# Altium PCB PCB_Micros.PcbDoc
Units mm, origin at the board's own origin, x right, y up, seen from the top; angles counter-clockwise.
Board outline 152.4 x 101.6 mm, 2 copper layers (Top Layer, Bottom Layer); 22 components, 23 nets, 137 pads, 0 vias.
Unrouted connection lines stored in the file: 55.
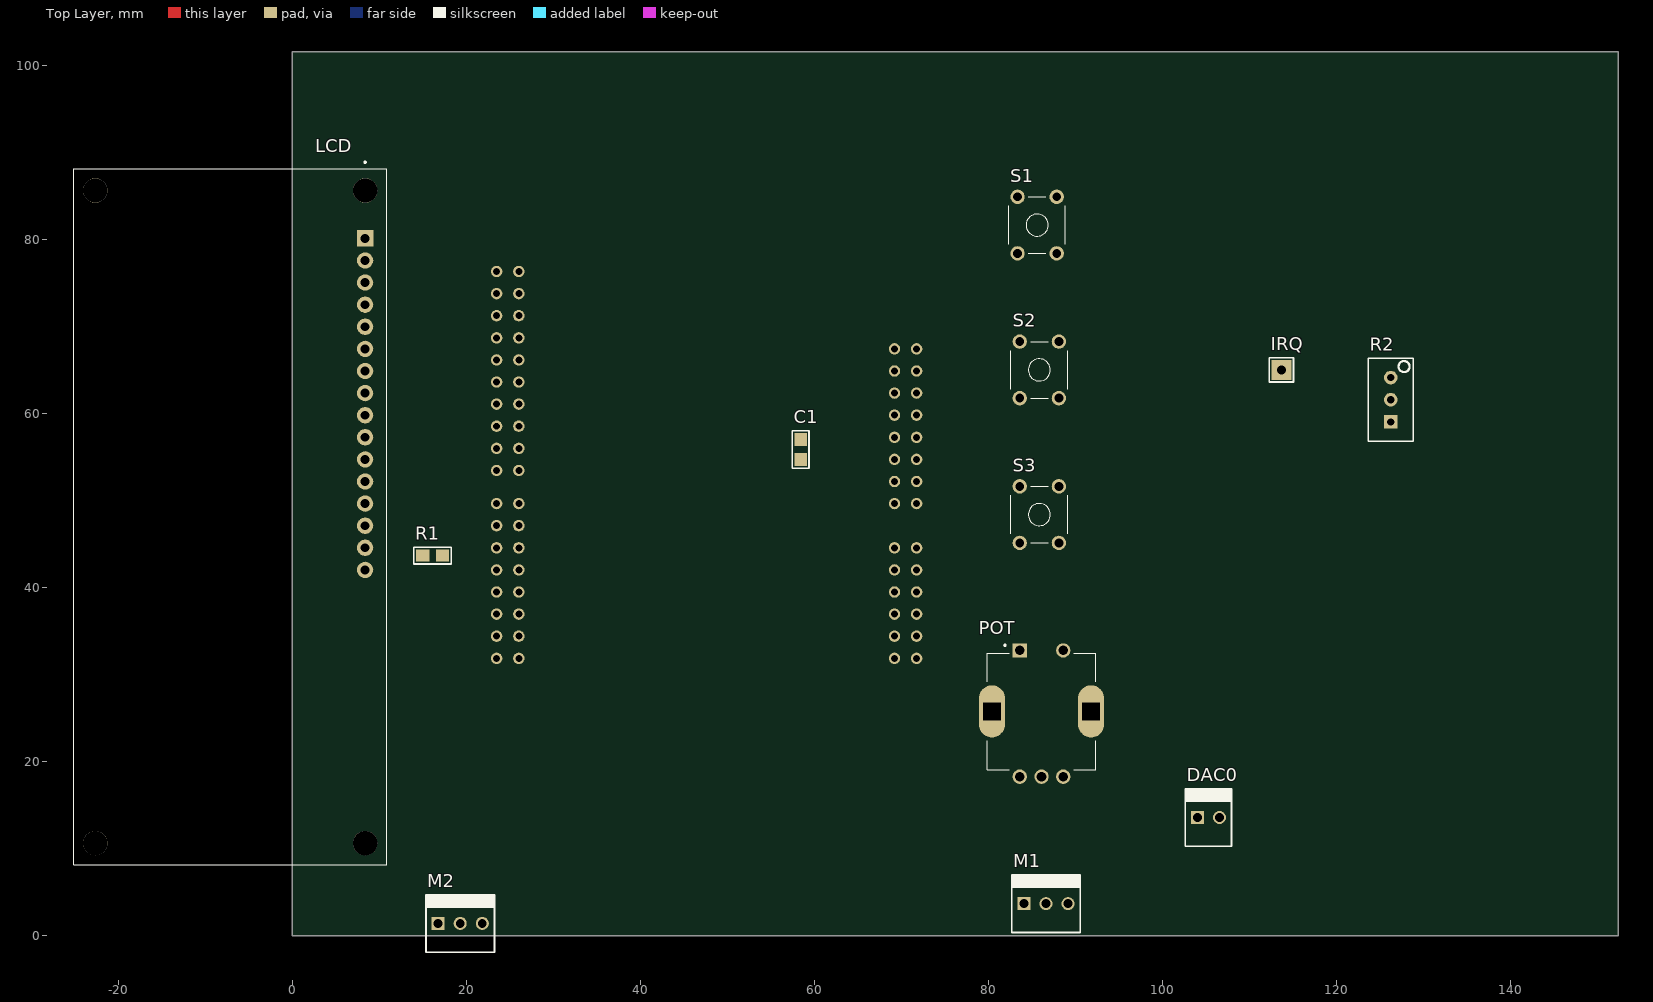
[diagram p0: Top Layer view]
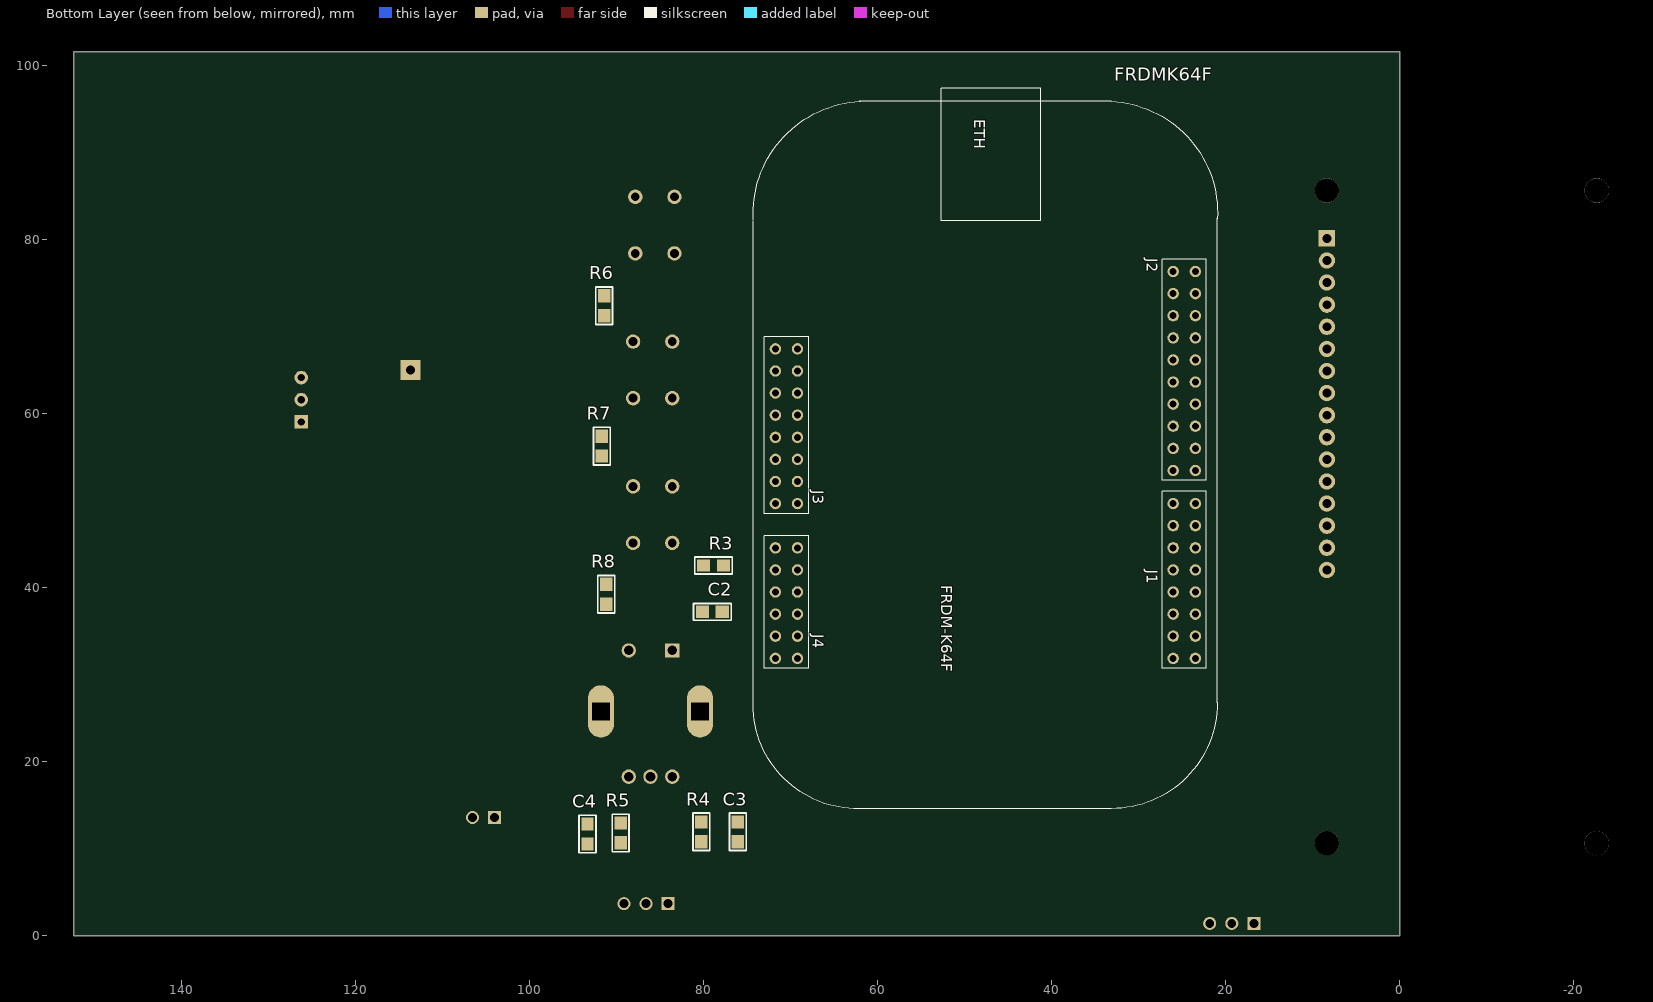
[diagram p1: Bottom Layer view, seen from below]

## Layer stack, top to bottom
Top Solder: solder mask 0.0102, Solder Resist, Dk 3.5
Top Layer: signal copper 0.0356
Dielectric 1: dielectric 0.32, FR-4, Dk 4.8
Bottom Layer: signal copper 0.0356
Bottom Solder: solder mask 0.0102, Solder Resist, Dk 3.5

## Board outline
0,0 152.4,0 152.4,101.6 0,101.6

## Design rules (kind name [scope] priority, off if disabled: settings)
Clearance [All] p1: gap=0.254 ignorepadtopadclearanceinfootprint=FALSE except(0: Arc-Hole Track-Hole SMDPad-Hole THPad-Hole Via-Hole Fill-Hole Poly-Hole Region-Hole Text-Hole)
PolygonConnect [All] p1: connectstyle=Relief reliefconductorwidth=0.254 reliefentries=4 polygonreliefangle="90 Angle" airgapwidth=0.254
RoutingVias [All] p1: holewidth=0.711 width=1.27 viastyle="Through Hole" minholewidth=0.711 minwidth=1.27 maxholewidth=0.711 maxwidth=1.27
SolderMaskExpansion [All] p1: expansion=0.102 istentingtop=FALSE
Width [All] p1: maxlimit=0.254 minlimit=0.254 preferedwidth=0.254
30 further rules are at their usual default settings.

## Components (designator, comment, footprint, x,y, rotation, side; value= is the part's Value field where it differs from the comment)
C1 "100n" 0805 58.42,55.88 r270 top
C2 "100n" 0805 78.994,37.211 r0 bottom
C3 "100n" 0805 76.073,11.938 r270 bottom
C4 "100n" 0805 93.345,11.684 r270 bottom
DAC0 "MOLEX2" MOLEX2 104.013,13.589 r0 top
FRDMK64F "FRDM-K64F" FRDM-K64F 47.625,55.499 r270 bottom
IRQ "TP" TPTH 113.665,65.024 r0 top
LCD "LCD-16X2" MODULE_LCD-16X2 -7.125,48.137 r270 top
M1 "MOLEX3" MOLEX3 84.074,3.683 r0 top
M2 "MOLEX3" MOLEX3 16.764,1.412 r0 top
POT "PEC11R-4215F-S0024" XDCR_PEC11R-4215F-S0024 86.106,25.781 r0 top (schematic designator MT?)
R1 "330" 0805 16.129,43.688 r180 top
R2 "10k" "PRESET V" 126.238,61.595 r90 top
R3 "10k" 0805 78.867,42.545 r0 bottom
R4 "10k" 0805 80.264,11.938 r270 bottom
R5 "10k" 0805 89.535,11.811 r270 bottom
R6 "10k" 0805 91.44,72.39 r90 bottom
R7 "10k" 0805 91.694,56.261 r270 bottom
R8 "10k" 0805 91.186,39.243 r90 bottom
S1 "PLAY SWITCH" TACTSWITCH 85.598,81.661 r0 top
S2 "NEXT SWITCH" TACTSWITCH 85.852,65.024 r0 top
S3 "PREV SWITCH" TACTSWITCH 85.852,48.387 r0 top

## Footprints (in the part's own frame and the unit in brackets; to place one, negate y for a bottom-side part, rotate by r counter-clockwise, add the part's x,y. Pads: shape width x height; smd on the part's side, far side on the other; paste and mask are expansions set on the pad)
0805 [mil] "Pasivo 0805"
  rect 60x56 smd: 1(-45,0) 2(45,0)
  silkscreen extent -85,-38 85,38, body extent -40,-25 39,25, height 15
FRDM-K64F [mm]
  round 1.308 hole 0.8: J1-1(23.622,21.59) J1-2(23.622,24.13) J1-3(21.082,21.59) J1-4(21.082,24.13) J1-5(18.542,21.59) J1-6(18.542,24.13) J1-7(16.002,21.59) J1-8(16.002,24.13) J1-9(13.462,21.59) J1-10(13.462,24.13) J1-11(10.922,21.59) J1-12(10.922,24.13) J1-13(8.382,21.59) J1-14(8.382,24.13) J1-15(5.842,21.59) J1-16(5.842,24.13) J2-1(2.032,21.59) J2-2(2.032,24.13) J2-3(-0.508,21.59) J2-4(-0.508,24.13) J2-5(-3.048,21.59) J2-6(-3.048,24.13) J2-7(-5.588,21.59) J2-8(-5.588,24.13) J2-9(-8.128,21.59) J2-10(-8.128,24.13) J2-11(-10.668,21.59) J2-12(-10.668,24.13) J2-13(-13.208,21.59) J2-14(-13.208,24.13) J2-15(-15.748,21.59) J2-16(-15.748,24.13) J2-17(-18.288,21.59) J2-18(-18.288,24.13) J2-19(-20.828,21.59) J2-20(-20.828,24.13) J3-1(-11.938,-21.59) J3-2(-11.938,-24.13) J3-3(-9.398,-21.59) J3-4(-9.398,-24.13) J3-5(-6.858,-21.59) J3-6(-6.858,-24.13) J3-7(-4.318,-21.59) J3-8(-4.318,-24.13) J3-9(-1.778,-21.59) J3-10(-1.778,-24.13) J3-11(0.762,-21.59) J3-12(0.762,-24.13) J3-13(3.302,-21.59) J3-14(3.302,-24.13) J3-15(5.842,-21.59) J3-16(5.842,-24.13) J4-1(10.922,-21.59) J4-2(10.922,-24.13) J4-3(13.462,-21.59) J4-4(13.462,-24.13) J4-5(16.002,-21.59) J4-6(16.002,-24.13) J4-7(18.542,-21.59) J4-8(18.542,-24.13) J4-9(21.082,-21.59) J4-10(21.082,-24.13) J4-11(23.622,-21.59) J4-12(23.622,-24.13)
  silkscreen extent -41.91,-26.69 40.89,26.69
MODULE_LCD-16X2 [mm]
  rect 1.88x1.88 / inner round 1.88 / far side rect 1.88x1.88 hole 1.016: 1(-32,15.5)
  round 1.88 hole 1.016: 2(-29.46,15.5) 3(-26.92,15.5) 4(-24.38,15.5) 5(-21.84,15.5) 6(-19.3,15.5) 7(-16.76,15.5) 8(-14.22,15.5) 9(-11.68,15.5) 10(-9.14,15.5) 11(-6.6,15.5) 12(-4.06,15.5) 13(-1.52,15.5) 14(1.02,15.5) 15(3.56,15.5) 16(6.1,15.5)
  round 2.8 hole 2.8 unplated: ""(-37.5,-15.5) ""(-37.5,15.5) ""(37.5,-15.5) ""(37.5,15.5)
  silkscreen extent -40.85,-18 40,18
MOLEX2 [mm]
  rect 1.5x1.5 hole 1.016: 1(0,0)
  round 1.5 hole 1.016: 2(2.54,0)
  silkscreen extent -1.4,-3.3 3.94,3.3, body extent -1.27,-3.17 3.81,3.17, height 10.74
MOLEX3 [mm]
  rect 1.5x1.5 hole 1.016: 1(0,0)
  round 1.5 hole 1.016: 2(2.54,0) 3(5.08,0)
  silkscreen extent -1.4,-3.3 6.48,3.3, body extent -1.27,-3.17 6.35,3.17, height 10.74
"PRESET V" [mil]
  rect 62x62 hole 32: 1(-100,0)
  round 62 hole 32: 2(0,0) 3(100,0)
  silkscreen extent -188,-102 188,102, body extent -185,-95 190,95, height 455
TACTSWITCH [mil]
  round 65 hole 40: 1(-88.58,-127.95) 2(-88.58,127.95) 3(88.58,-127.95) 4(88.58,127.95)
  silkscreen extent -128,-128 128,128, body extent -120,-156 124,156, height 276
TPTH [mm]
  rect 2.3x2.3 hole 1.016: 1(0,0)
  silkscreen extent -1.4,-1.4 1.4,1.4, body extent -1.27,-1.27 1.27,1.27, height 6.04
XDCR_PEC11R-4215F-S0024 [mm]
  rect 1.65x1.65 hole 1.1: 1(-2.5,7)
  round 1.65 hole 1.1: 2(2.5,7) A(-2.5,-7.5) B(2.5,-7.5) COM(0,-7.5)
  oval 3x6 hole 2 square: S1(-5.7,0) S2(5.7,0)
  silkscreen extent -6.25,-6.7 6.25,7.7

## Part data
C1 C2 C3 C4: library part CAP
FRDMK64F: "K24, K63, K64, mbed-Enabled Development Freedom Kinetis ARMÂ® CortexÂ®-M4 MCU 32-Bit Embedded Evaluation Board", Package=None, Availability=Unavailable, MF="NXP USA", MP=FRDM-K64F, Price=None, SnapEDA_Link=https://www.snapeda.com/parts/FRDM-K64F/NXP%20USA%20Inc./view-part/508270/?ref=snap
LCD: "Display Development Tools 16x2 Black on Green Char LCD w Backlight", Package=None, Availability="Not in stock", Check_prices=https://www.snapeda.com/parts/LCD-16X2/Gravitech/view-part/?ref=eda, MF=Gravitech, MP=LCD-16X2, Price=None, SnapEDA_Link=https://www.snapeda.com/parts/LCD-16X2/Gravitech/view-part/?ref=snap
POT: "Incremental Encoder, 12 Mm, Contact Rating 10 Ma - 5 Vdc", Package=None, Availability=Unavailable, MP=PEC11R-4215F-S0024, Price=None
R1 R3 R4 R5 R6 R7 R8: library part RES
R2: library part PRESET
S1 S2 S3: library part "TACT SWITCH"

## Nets (pads, with @x,y where several pads share a name; then routed paths per layer and width w, separated by ;. In a path a pad name is that pad's centre, name@x,y a point inside that pad or via, vN(x,y) a via of type N, cw(c..) or ccw(c..) an arc to the next point about the centre after c; other vN are vias at no path point)
DIO_1: FRDMK64F.J2-12 LCD.4
DIO_2: FRDMK64F.J2-10 LCD.6
DIO_3: FRDMK64F.J2-8 LCD.11
DIO_4: FRDMK64F.J2-6 LCD.12
DIO_5: FRDMK64F.J2-4 LCD.13
DIO_6: FRDMK64F.J2-2 LCD.14
DIO_7: C3.1 FRDMK64F.J1-15 POT.A R4.1
DIO_8: C4.1 FRDMK64F.J1-13 POT.B R5.1
DIO_9: C2.1 FRDMK64F.J1-11 POT.1 R3.1
DIO_10: FRDMK64F.J1-10 S1.1
DIO_11: FRDMK64F.J1-8 S2.1
DIO_12: FRDMK64F.J1-6 S3.1
DIO_17: FRDMK64F.J1-14 M1.2
DIO_18: FRDMK64F.J1-16 M2.2
GND: C1.2 C2.2 C3.2 C4.2 DAC0.2 FRDMK64F.J2-3 LCD.1 LCD.5 LCD.16 M1.1 M2.3 POT.2 POT.COM R2.3 R6.1 R7.1 R8.1
NetDAC0_1: DAC0.1 FRDMK64F.J4-11
NetFRDMK64F_J4-2: FRDMK64F.J4-2 IRQ.1
NetLCD_3: LCD.3 R2.2
NetLCD_15: LCD.15 R1.2
NetR6_2: R6.2 S1.3
NetR7_2: R7.2 S2.3
NetR8_2: R8.2 S3.3
Vcc: C1.1 FRDMK64F.J3-10 LCD.2 M1.3 M2.1 R1.1 R2.1 R3.2 R4.2 R5.2 S1.4 S2.4 S3.4
pads on no net: FRDMK64F.J1-1 FRDMK64F.J1-2 FRDMK64F.J1-3 FRDMK64F.J1-4 FRDMK64F.J1-5 FRDMK64F.J1-7 FRDMK64F.J1-9 FRDMK64F.J1-12 FRDMK64F.J2-1 FRDMK64F.J2-5 FRDMK64F.J2-7 FRDMK64F.J2-9 FRDMK64F.J2-11 FRDMK64F.J2-13 FRDMK64F.J2-14 FRDMK64F.J2-15 FRDMK64F.J2-16 FRDMK64F.J2-17 FRDMK64F.J2-18 FRDMK64F.J2-19 FRDMK64F.J2-20 FRDMK64F.J3-1 FRDMK64F.J3-2 FRDMK64F.J3-3 FRDMK64F.J3-4 FRDMK64F.J3-5 FRDMK64F.J3-6 FRDMK64F.J3-7 FRDMK64F.J3-8 FRDMK64F.J3-9 FRDMK64F.J3-11 FRDMK64F.J3-12 FRDMK64F.J3-13 FRDMK64F.J3-14 FRDMK64F.J3-15 FRDMK64F.J3-16 FRDMK64F.J4-1 FRDMK64F.J4-3 FRDMK64F.J4-4 FRDMK64F.J4-5 FRDMK64F.J4-6 FRDMK64F.J4-7 FRDMK64F.J4-8 FRDMK64F.J4-9 FRDMK64F.J4-10 FRDMK64F.J4-12 LCD. LCD.7 LCD.8 LCD.9 LCD.10 POT.S1 POT.S2 S1.2 S2.2 S3.2

## Text inside footprints (layer, text, board x,y; h text height)
FRDMK64F: Bottom Overlay "J1" at 29.083,42.037 h1.27 r90; Bottom Overlay "J2" at 29.083,77.851 h1.27 r90; Bottom Overlay "J4" at 67.437,34.671 h1.27 r90; Bottom Overlay "J3" at 67.437,51.181 h1.27 r90; Bottom Overlay "ETH" at 48.895,93.853 h1.27 r90